# Altium PCB PCB_Flex_LED_v2.2.PcbDoc
Units mil, origin at the board's own origin, x right, y up, seen from the top; angles counter-clockwise.
Board outline 354.33 x 2245.87 mil, 2 copper layers (Top Layer, Bottom Layer), stack 3.756 mil thick; 8 components, 4 nets, 8 pads, 0 vias.
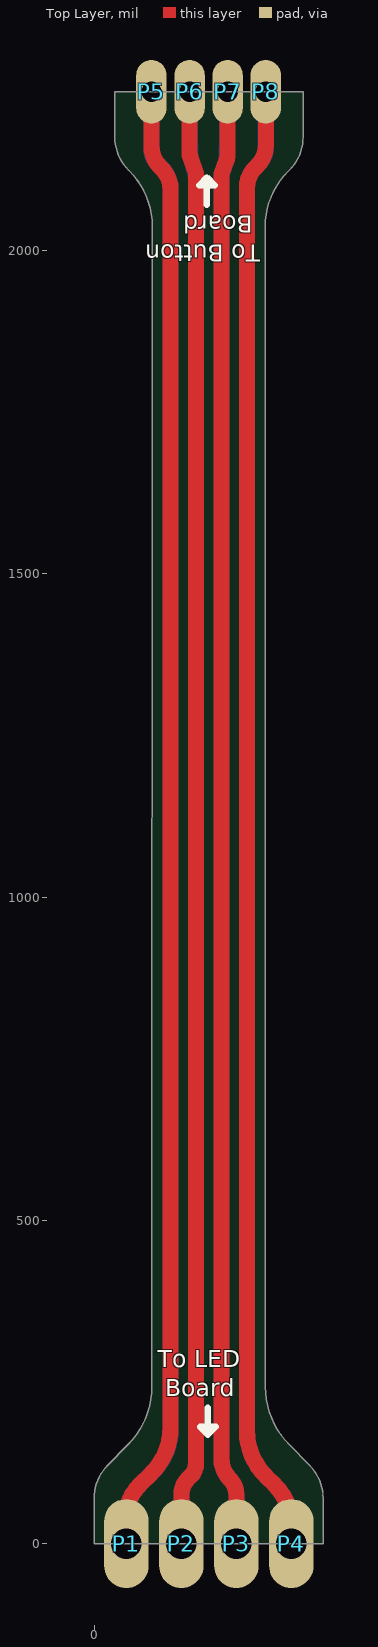
[diagram p0: Top Layer view]
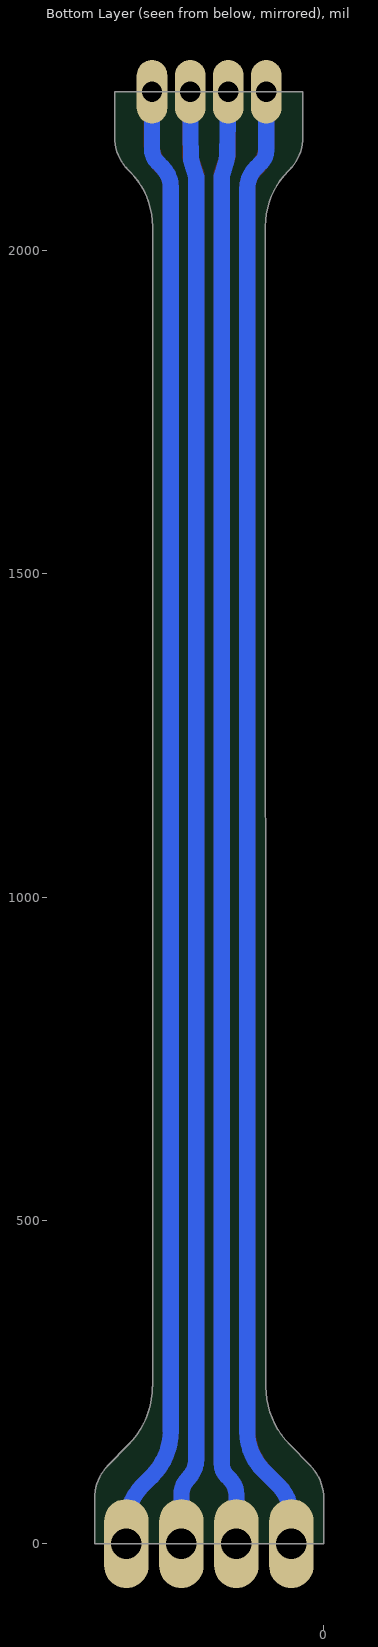
[diagram p1: Bottom Layer view, seen from below]

## Layer stack, top to bottom
Top Solder: solder mask 0.5, Solder Resist, Dk 3.5
Top Layer: signal copper 1.378
Dielectric 1: core 1, Polyimide, Dk 3.5
Bottom Layer: signal copper 1.378
Bottom Solder: solder mask 0.5, Solder Resist, Dk 3.5

## Board outline
0,0 0,70 cw(c72.43,70) 21.21,121.21 52.2,152.86 ccw(c-37.85,242.92) 89.5,242.92 90.04,2002.96 90.04,2037.87 ccw(c-30.67,2037.87) 54.69,2123.22 53.25,2124.66 cw(c104.47,2175.87) 32.04,2175.87 32.04,2245.87 323.38,2245.87 323.38,2175.87 cw(c250.95,2175.87) 302.16,2124.66 299.99,2122.48 ccw(c385.34,2037.13) 264.63,2037.13 264.63,2008.34 264.63,242.92 264.83,242.92 ccw(c392.18,242.92) 302.13,152.86 333.12,121.21 cw(c281.9,70) 354.33,70 354.33,0

## Design rules (kind name [scope] priority, off if disabled: settings)
Clearance [All] p1: gap=10 ignorepadtopadclearanceinfootprint=FALSE except(0: Arc-Hole Track-Hole SMDPad-Hole THPad-Hole Via-Hole Fill-Hole Poly-Hole Region-Hole Text-Hole)
ComponentClearance [All] p1: gap=5 collisioncheckmode=3 verticalgap=5 showdistances=FALSE
HoleToHoleClearance [All] p1: gap=0 allowstackedmicrovias=TRUE
MinimumSolderMaskSliver [All] p1: minsoldermaskwidth=0
PolygonConnect [All] p1: connectstyle=Relief reliefconductorwidth=10 reliefentries=4 polygonreliefangle="90 Angle" airgapwidth=10
RoutingVias [All] p1: holewidth=11.81 width=23.62 viastyle="Through Hole" minholewidth=11.81 minwidth=23.62 maxholewidth=11.81 maxwidth=23.62
SilkToSilkClearance [All] p1: silktosilkclearance=0
SilkToSolderMaskClearance [IsPad] p1: minsilkscreentomaskgap=0 clearancetoexposedcopper=TRUE
SolderMaskExpansion [All] p1: expansion=4 istentingtop=FALSE
Width [All] p1: maxlimit=25 minlimit=10 preferedwidth=10 minimp=50.000000 maximp=50.000000 favimp=50.000000
25 further rules are at their usual default settings.

## Components (designator, comment, footprint, x,y, rotation, side; value= is the part's Value field where it differs from the comment)
P1 "0.5mm Test Pad" "0.5mm Test Pad"#1 50,0 r270 top
P2 "0.5mm Test Pad" "0.5mm Test Pad"#1 135.05,0 r270 top
P3 "0.5mm Test Pad" "0.5mm Test Pad"#1 220.09,0 r270 top
P4 "0.5mm Test Pad" "0.5mm Test Pad"#1 305.14,0 r270 top
P5 "0.5mm Test Pad" "0.5mm Test Pad"#2 88.75,2245.87 r180 top
P6 "0.5mm Test Pad" "0.5mm Test Pad"#2 147.74,2245.87 r180 top
P7 "0.5mm Test Pad" "0.5mm Test Pad"#2 206.52,2245.87 r180 top
P8 "0.5mm Test Pad" "0.5mm Test Pad"#2 265.51,2245.87 r180 top

## Footprints (in the part's own frame and the unit in brackets; to place one, negate y for a bottom-side part, rotate by r counter-clockwise, add the part's x,y. Pads: shape width x height; smd on the part's side, far side on the other; paste and mask are expansions set on the pad)
"0.5mm Test Pad"#1 [mm]
  oval 3.5x1.75 hole 1.2: 1(0,0)
"0.5mm Test Pad"#2 [mm]
  oval 1.2x2.5 hole 0.8: 1(0,0)

## Part data
P1 P2 P3 P4 P5 P6 P7 P8: "Test pad"

## Nets (pads, with @x,y where several pads share a name; then routed paths per layer and width w, separated by ;. In a path a pad name is that pad's centre, name@x,y a point inside that pad or via, vN(x,y) a via of type N, cw(c..) or ccw(c..) an arc to the next point about the centre after c; other vN are vias at no path point)
NetP1_1: P1.1 P5.1 | length 4510.2
  Top Layer w25: P1.1 50,41.72 cw(c118.28,41.72) 70,90 89.01,109.01 ccw(c18.3,179.72) 118.3,179.72 118.3,191.55 118.3,2056.05 118.3,2095.14 ccw(c74.45,2095.14) 105.45,2126.14 102.23,2129.36 cw(c134.78,2161.91) 88.75,2161.91 P5.1
  Bottom Layer w25: P1.1@50,41.72 cw(c118.28,41.72) 70,90 93.16,113.16 ccw(c32.58,173.8) 118.3,173.8 118.3,2094.94 ccw(c70.87,2094.94) 104.41,2128.48 96.43,2136.46 cw(c114.96,2154.99) 88.75,2154.99 P5.1
NetP2_1: P2.1 P6.1 | length 4508
  Top Layer w25: P2.1 135.05,75.64 cw(c169.5,75.64) 145.14,100 149.81,104.67 ccw(c130.83,123.65) 157.67,123.65 ; P6.1 147.74,2152.27 ccw(c172.74,2152.27) 149.13,2144.05 ; 149.14,2144.02 157.67,2119.63 157.67,123.65
  Bottom Layer w25: P2.1 135.05,75.64 cw(c169.5,75.64) 145.14,100 149.81,104.67 ccw(c130.83,123.65) 157.67,123.65 ; P6.1 147.74,2220.28 149.09,2147.3 ccw(c174.09,2147.76) 150.06,2140.84 150.08,2140.79 157.67,2114.66 157.67,123.65
NetP3_1: P3.1 P7.1 | length 4506.8
  Top Layer w25: P7.1 206.52,2220.28 206.52,2148.57 cw(c181.52,2148.57) 204.96,2139.88 204.94,2139.82 197.04,2118.68 197.04,131.3 ccw(c241.3,131.3) 210,100 cw(c185.64,75.64) 220.09,75.64 P3.1
  Bottom Layer w25: P7.1 206.52,2220.28 205,2143.27 cw(c180.01,2143.76) 203.92,2136.46 197.04,2113.93 197.04,2099.27 197.04,191.55 197.04,131.3 ccw(c241.3,131.3) 210,100 cw(c185.64,75.64) 220.09,75.64 P3.1
NetP4_1: P4.1 P8.1 | length 4516.2
  Top Layer w25: 249.25,2128.04 ccw(c280.25,2097.03) 236.41,2097.03 236.41,175.02 ccw(c336.41,175.02) 265.7,104.3 280,90 cw(c219.32,29.32) 305.14,29.32 P4.1 ; 252.47,2131.26 ccw(c219.92,2163.81) 265.95,2163.81 265.95,2244.81 ccw(c264.45,2244.81) P8.1
  Bottom Layer w25: P8.1 265.51,2157.14 cw(c236.27,2157.14) 256.95,2136.46 249.5,2129.01 ccw(c281.12,2097.4) 236.41,2097.4 236.41,175.02 ccw(c336.41,175.02) 265.7,104.3 280,90 cw(c219.32,29.32) P4.1@305.14,29.32

## Silkscreen, mask and mechanical layers (free items; w line width, h text height)
Top Overlay:
  lines w10: 174.63,2071.23 174.63,2112.95 ; 175.94,210.27 175.94,168.55 ; 174.63,2112.95 162.63,2100.95 186.63,2100.95 174.63,2112.95 ; 175.94,168.55 187.94,180.55 163.94,180.55 175.94,168.55
  text "To Button /  Board" at 256.92,2063.08 h45 r180
  text "To LED /  Board" at 98.73,218.36 h45
Board Outline:
  the board outline again, w10
Fabrication info:
  drawing of 195 lines, arcs and shapes, not listed
  text "Layer" at 4031.82,2333.55 h60
  text "Name" at 4441.73,2333.55 h60
  text "Material" at 5371.48,2333.55 h60
  text "Thickness" at 6231.24,2333.55 h60
  text "Constant" at 6881.08,2333.55 h60
  text "Board Layer Stack" at 7450.94,2333.55 h60
  text "Top Overlay" at 4441.73,2213.55 h60
  text "Stiffener Area: 2.6mm" at 614.84,2178.77 h60
  text "Top Solder" at 4441.73,2093.55 h60
  text "Solder Resist" at 5371.48,2093.55 h60
  text "0.50mil" at 6231.24,2093.55 h60
  text "3.5" at 6881.08,2093.55 h60
  text "1" at 4031.82,1973.55 h60
  text "Top Layer" at 4441.73,1973.55 h60
  text "1.38mil" at 6231.24,1973.55 h60
  text "Dielectric 1" at 4441.73,1853.55 h60
  text "Polyimide" at 5371.48,1853.55 h60
  text "1.00mil" at 6231.24,1853.55 h60
  text "3.5" at 6881.08,1853.55 h60
  text "2" at 4031.82,1733.55 h60
  text "Bottom Layer" at 4441.73,1733.55 h60
  text "1.38mil" at 6231.24,1733.55 h60
  text "Bottom Solder" at 4441.73,1613.55 h60
  text "Solder Resist" at 5371.48,1613.55 h60
  text "0.50mil" at 6231.24,1613.55 h60
  text "3.5" at 6881.08,1613.55 h60
  text "Bottom Overlay" at 4441.73,1493.55 h60
  text "Note:" at 454.26,1477.59 h60
  text "Total board thickness:" at 4031.82,1373.55 h60
  text "4.76mil" at 6231.24,1373.55 h60
  text "Stiffener Material: Polyimide" at 448.26,1362.59 h60
  text "Stiffener Thickness: 0.225 mm" at 449.53,1266.6 h60
  text "Stiffener side: Bottom side of PCB" at 448.57,1180.6 h60
  text "Total Thickness of PCB (0.3mm): Stiffener thickness + Layer Stackup thickness." at 440.2,747.56 h60
  text "Stiffener Area: 2.6mm" at 640.26,35.59 h60
Drill Drawing:
  circle w10: c336.1,2830.39 r33.33
  lines w10: 302.77,2947.05 369.44,2947.05 369.44,3013.72 302.77,3013.72 302.77,2947.05
  lines w15: 242.98,2752.05 8810.61,2752.05 ; 242.98,3052.05 8810.61,3052.05 ; 793.85,2602.05 793.85,3202.05 ; 1273.73,2602.05 1273.73,3202.05 ; 2363.42,2602.05 2363.42,3202.05 ; 2869.29,2602.05 2869.29,3202.05 ; 3603.09,2602.05 3603.09,3202.05 ; 5102.64,2602.05 5102.64,3202.05 ; 5692.49,2602.05 5692.49,3202.05 ; 6438.29,2602.05 6438.29,3202.05 ; 7408.01,2602.05 7408.01,3202.05 ; 242.98,2602.05 8810.61,2602.05 8810.61,3202.05 242.98,3202.05 242.98,2602.05
  text "Symbol" at 332.98,3097.05 h72
  text "Count" at 838.85,3097.05 h72
  text "Hole Size" at 1318.73,3097.05 h72
  text "Plated" at 2408.42,3097.05 h72
  text "Hole Type" at 2914.29,3097.05 h72
  text "Drill Layer Pair" at 3648.09,3097.05 h72
  text "Via/Pad" at 5147.64,3097.05 h72
  text "Pad Shape" at 5737.49,3097.05 h72
  text "Template" at 6483.29,3097.05 h72
  text "Routed Path Length" at 7453.01,3097.05 h72
  text "4" at 838.85,2947.05 h60
  text "11.81mil (0.300mm)" at 1318.73,2947.05 h60
  text "PTH" at 2408.42,2947.05 h60
  text "Round" at 2914.29,2947.05 h60
  text "Top Layer - Bottom Layer" at 3648.09,2947.05 h60
  text "Via" at 5147.64,2947.05 h60
  text "Rounded" at 5737.49,2947.05 h60
  text "v60h30" at 6483.29,2947.05 h60
  text "-" at 7453.01,2947.05 h60
  text "4" at 838.85,2797.05 h60
  text "47.24mil (1.200mm)" at 1318.73,2797.05 h60
  text "PTH" at 2408.42,2797.05 h60
  text "Round" at 2914.29,2797.05 h60
  text "Top Layer - Bottom Layer" at 3648.09,2797.05 h60
  text "Pad" at 5147.64,2797.05 h60
  text "Rounded" at 5737.49,2797.05 h60
  text "r350_175h120r88" at 6483.29,2797.05 h60
  text "-" at 7453.01,2797.05 h60
  text "8 Total" at 838.85,2647.05 h60